# Altium PCB BetaBake_REV_1.0.PcbDoc (part 6 of 8)
Units mil, origin at the board's own origin, x right, y up, seen from the top; angles counter-clockwise.
Board outline 6000 x 4000 mil, 8 copper layers (USB 2.0 (90 Diff) DDR3 Data (50-100), GND (Top Layer high-speed return paths), DDR3 Fly-by Routing (Address, Command, Control), QSPI Flash (Clk, IO), Int4 PWR, Int5 GND (Shielding between L4 and L6), Int6 eMMC High-Speed Data Lines (8-bit bus), SDIO/peripherals, Int7 GND, Escapes, non-critical tracks, decoupling capacitor vias), stack 60.424 mil thick; 426 components, 331 nets, 1941 pads, 428 vias.
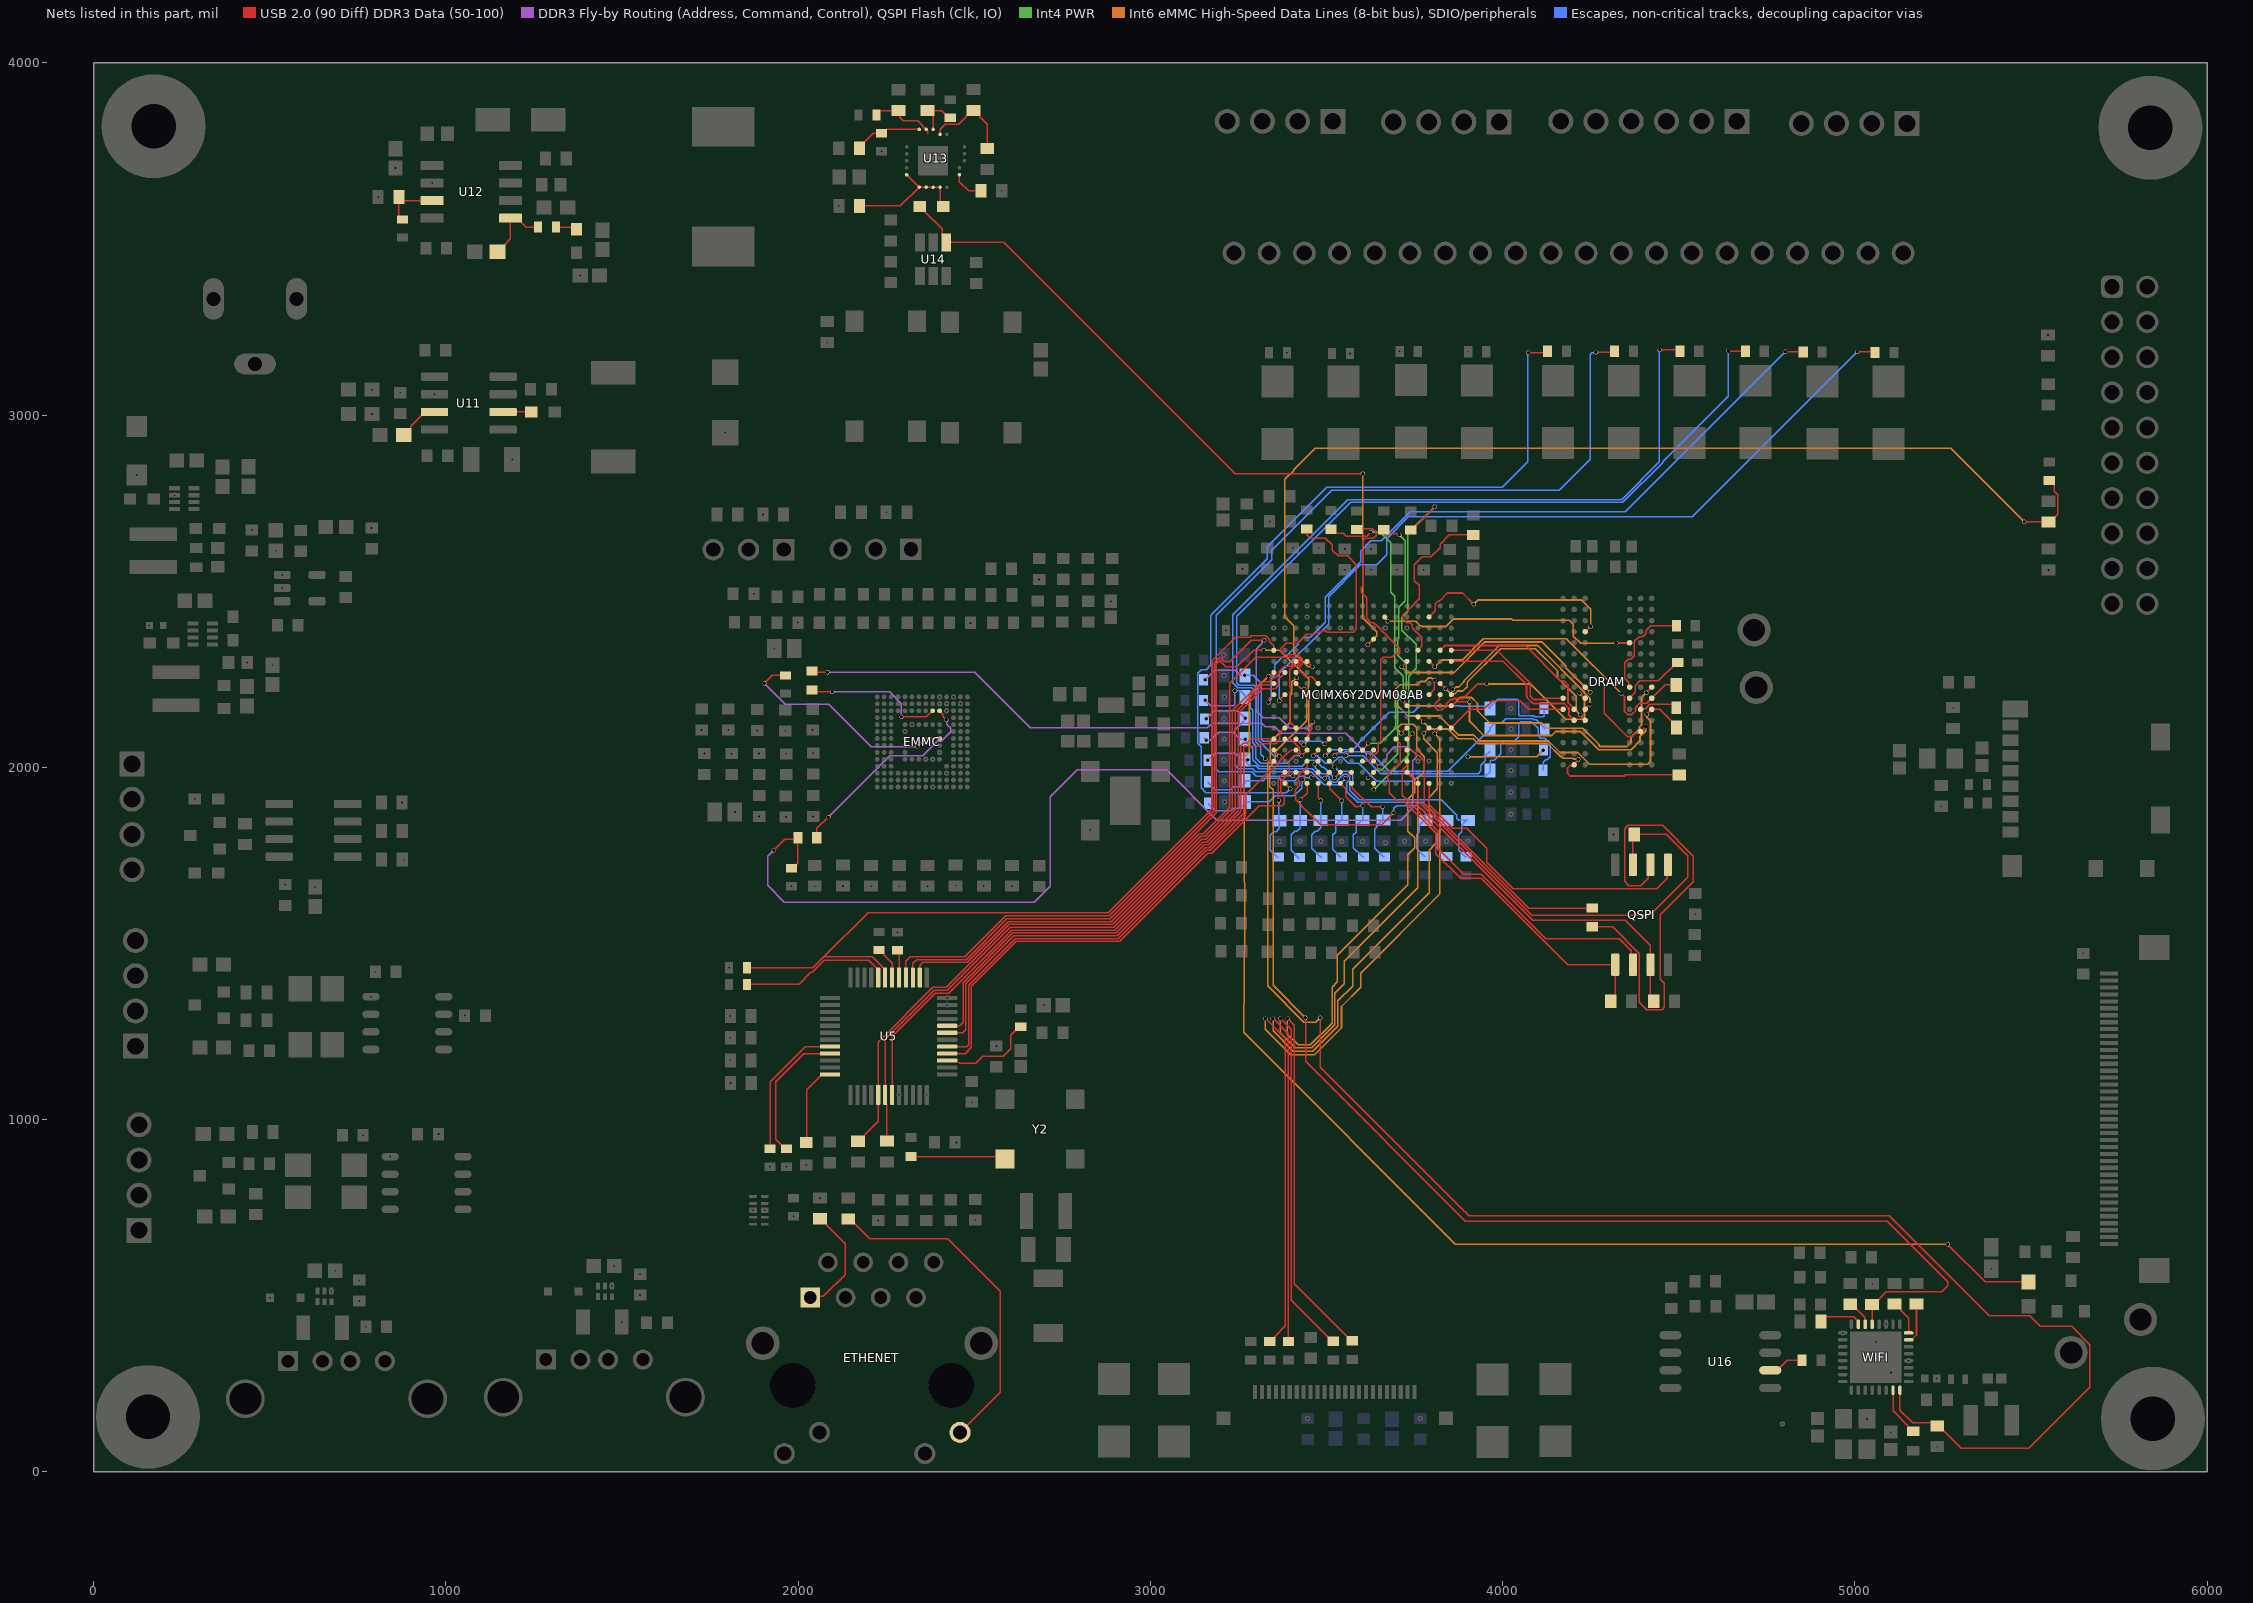
[diagram p11: the nets of this part, all layers, seen from the top]

## Via types
v1: diameter 12, hole 10, USB 2.0 (90 Diff) DDR3 Data (50-100) to Escapes, non-critical tracks, decoupling capacitor vias, 382 vias
v2: diameter 50, hole 26, USB 2.0 (90 Diff) DDR3 Data (50-100) to Escapes, non-critical tracks, decoupling capacitor vias, 28 vias
v3: diameter 19.68, hole 7.87, USB 2.0 (90 Diff) DDR3 Data (50-100) to Escapes, non-critical tracks, decoupling capacitor vias, 9 vias
v4: diameter 23.62, hole 11.81, USB 2.0 (90 Diff) DDR3 Data (50-100) to Escapes, non-critical tracks, decoupling capacitor vias, 5 vias
v5: diameter 7.87, hole 7.87, USB 2.0 (90 Diff) DDR3 Data (50-100) to Escapes, non-critical tracks, decoupling capacitor vias, 4 vias

## Nets (pads, with @x,y where several pads share a name; then routed paths per layer and width w, separated by ;. In a path a pad name is that pad's centre, name@x,y a point inside that pad or via, vN(x,y) a via of type N, cw(c..) or ccw(c..) an arc to the next point about the centre after c; other vN are vias at no path point) (continued)
NetR10_2: MCIMX6Y2DVM08AB.D10 R10.2 R117.1 | length 770
  USB 2.0 (90 Diff) DDR3 Data (50-100) w4: v1(3555,2033) 3555,2033.13 3570.75,2048.88 MCIMX6Y2DVM08AB.D10@3570.75,2049.01
  Int6 eMMC High-Speed Data Lines (8-bit bus), SDIO/peripherals w4: v1(3901,2030) 4096.64,2030 v1(4115.64,2049)
  Escapes, non-critical tracks, decoupling capacitor vias w4: v1(3555,2033) 3603.86,2033 3654.59,1982.27 3930.27,1982.27 3938,1990 3938,2005.62 3950.72,2018.34 R10.2@3950.72,2032.31 ; v1(3901,2030) 3944.47,2030 3946.79,2032.31 R10.2@3950.72,2032.31 ; R10.2@3964.47,2046.06 R10.2@3950.72,2032.31
NetR11_2: MCIMX6Y2DVM08AB.B10 R11.2 R110.1 | length 646.7
  USB 2.0 (90 Diff) DDR3 Data (50-100) w4: v1(3554,1969) 3554,1969.13 3570.75,1985.88 MCIMX6Y2DVM08AB.B10@3570.75,1986.02
  DDR3 Fly-by Routing (Address, Command, Control), QSPI Flash (Clk, IO) w4: v1(3158.45,2138.34) 3180.74,2160.63 3247.12,2160.63 v1(3268.76,2138.98)
  Escapes, non-critical tracks, decoupling capacitor vias w4: R110.1@3153.28,2137 3155.46,2137 ccw(c3155.46,2141) v1(3158.45,2138.34) ; v1(3268.76,2138.98) 3268.76,2135.05 3241,2107.28 3241,2005.83 3251.16,1995.67 3290.31,1995.67 3298.32,1987.66 3456.44,1987.66 3494.1,1950 3535,1950 v1(3554,1969)
NetR12_2: MCIMX6Y2DVM08AB.A10 R12.2 R111.1 | length 292.4
  USB 2.0 (90 Diff) DDR3 Data (50-100) w4: MCIMX6Y2DVM08AB.A10@3570.75,1954.52 3571.45,1954.52 3572.76,1953.21 3572.76,1941.24 3626.51,1887.49 v1(3659,1887.49)
  Escapes, non-critical tracks, decoupling capacitor vias w4: v1(3659,1887.49) 3659,1853.28 R12.2@3662.24,1850.04 3658.3,1850.04 3644.55,1836.29 3644.55,1832.35 3636.55,1824.35 3636.55,1770.29 3661.22,1745.63 R111.1@3664.24,1745.63
NetR13_2: MCIMX6Y2DVM08AB.D11 R13.2 R119.1 | length 728
  USB 2.0 (90 Diff) DDR3 Data (50-100) w4: v1(3523,2033) 3523.12,2033 3539.13,2049.01 MCIMX6Y2DVM08AB.D11@3539.25,2049.01
  Escapes, non-critical tracks, decoupling capacitor vias w4: v1(3523,2033) 3531.93,2041.93 3549.79,2041.93 3551.86,2044 3622.14,2044 3677.87,1988.27 3843.74,1988.27 3946.79,2091.31 3950.72,2091.31 3964.47,2105.06 R13.2@3964.47,2109 3964.47,2112.94 3978.22,2126.69 3997.29,2126.69 4008.6,2137.99 4085.12,2137.99 4088.43,2134.69 4095.98,2134.69 4119.64,2111.02 R119.1@4119.64,2108
NetR14_2: MCIMX6Y2DVM08AB.B11 R14.2 R120.1 | length 497
  USB 2.0 (90 Diff) DDR3 Data (50-100) w4: v1(3522,1970) 3522.62,1970 3538.63,1986.02 MCIMX6Y2DVM08AB.B11@3539.25,1986.02
  DDR3 Fly-by Routing (Address, Command, Control), QSPI Flash (Clk, IO) w4: v1(3157.85,2076.45) 3169.9,2076.45 3193.46,2100 3235.82,2100 3256.76,2079.06 3267.84,2079.06 v1(3268.76,2079.98)
  Escapes, non-critical tracks, decoupling capacitor vias w4: R120.1@3153,2084 3157.85,2079.15 v1(3157.85,2076.45) ; v1(3268.76,2079.98) 3268.76,2076.05 3290.51,2054.3 3290.51,2021.46 3308.31,2003.66 3430.91,2003.66 3447.21,2019.95 3469.09,2019.95 3488.54,2000.5 3491.5,2000.5 v1(3522,1970)
NetR15_2: MCIMX6Y2DVM08AB.A11 R15.2 R122.1 | length 278.2
  USB 2.0 (90 Diff) DDR3 Data (50-100) w4: MCIMX6Y2DVM08AB.A11@3539.25,1954.52 3555,1938.77 3555,1916 3583.51,1887.49 3588.08,1887.49 3590.55,1889.95 3600.71,1889.95 v1(3602.24,1891.49)
  Escapes, non-critical tracks, decoupling capacitor vias w4: v1(3602.24,1891.49) R15.2@3602.24,1849.04 3598.3,1849.04 3584.55,1835.29 3584.55,1816.22 3576.55,1808.22 3576.55,1771.29 3602.22,1745.63 R122.1@3605.24,1745.63
NetR16_2: MCIMX6Y2DVM08AB.E12 R16.2 R125.1 | length 553.1
  USB 2.0 (90 Diff) DDR3 Data (50-100) w4: v1(3494.32,2066.7) 3494.32,2066.89 3507.76,2080.32 MCIMX6Y2DVM08AB.E12@3507.76,2080.5
  DDR3 Fly-by Routing (Address, Command, Control), QSPI Flash (Clk, IO) w4: v1(3155.85,2249) 3182.69,2275.84 3241.35,2275.84 3256.19,2261 v1(3268,2261)
  Escapes, non-critical tracks, decoupling capacitor vias w4: R125.1@3151,2249 v1(3155.85,2249) ; v1(3268,2261) 3292,2261 3314.51,2238.49 3314.51,2080.28 3320.79,2074 3484.86,2074 3492.16,2066.7 v1(3494.32,2066.7)
NetR17_2: MCIMX6Y2DVM08AB.D12 R17.2 R112.1 | length 785
  USB 2.0 (90 Diff) DDR3 Data (50-100) w4: v1(3496.27,2033.26) 3496.27,2035.39 3507.76,2046.88 MCIMX6Y2DVM08AB.D12@3507.76,2049.01
  Escapes, non-critical tracks, decoupling capacitor vias w4: v1(3496.27,2033.26) 3513.01,2050 3575,2050 3591.74,2066.74 3591.74,2070 3678.24,2156.5 3745.5,2156.5 3764.17,2175.17 3878.14,2175.17 3879.31,2174 3957,2174 R17.2@3964,2167 3964,2170.94 3985.75,2192.69 4041.29,2192.69 4045.39,2188.58 4045.39,2149.53 4048.93,2145.99 4088.44,2145.99 4090.75,2143.67 4115.3,2143.67 4117.64,2146.01 R112.1@4117.64,2168
NetR18_2: MCIMX6Y2DVM08AB.C12 R18.2 R127.1 | length 627.2
  USB 2.0 (90 Diff) DDR3 Data (50-100) w4: MCIMX6Y2DVM08AB.C12@3507.76,2017.51 v1(3523,2001)
  Escapes, non-critical tracks, decoupling capacitor vias w4: v1(3523,2001) 3535,1989 3562.28,1989 3574,1977.28 3574,1960.72 3566.1,1952.82 3566.1,1934.7 3592.8,1908 3825.67,1908 3868.98,1864.69 3868.98,1856.08 3875.55,1849.51 R18.2@3897.3,1849.51 ; R127.1@3896.24,1746.27 3893.22,1746.27 3875.55,1763.93 3875.55,1808.69 3883.55,1816.69 3883.55,1835.76 R18.2@3897.3,1849.51 ; R18.2@3901.24,1849.51 R18.2@3897.3,1849.51
NetR19_2: MCIMX6Y2DVM08AB.B12 R19.2 R128.1 | length 417.5
  USB 2.0 (90 Diff) DDR3 Data (50-100) w4: v1(3494.86,1968.86) 3494.86,1969.08 3492.97,1970.97 MCIMX6Y2DVM08AB.B12@3507.76,1986.02
  DDR3 Fly-by Routing (Address, Command, Control), QSPI Flash (Clk, IO) w4: v1(3163.24,2019.98) 3183.87,2040.61 3241,2040.61 3259.63,2021.98 v1(3277,2021.98)
  Escapes, non-critical tracks, decoupling capacitor vias w4: v1(3163.24,2019.98) R128.1@3168.09,2019.98 ; v1(3277,2021.98) R19.2@3268.76,2021.98 3268.76,2018.05 3282.51,2004.3 3299.19,2004.3 3307.83,1995.66 3459.75,1995.66 3485.02,1970.39 3493.33,1970.39 v1(3494.86,1968.86)
NetR20_2: MCIMX6Y2DVM08AB.A12 R20.2 R113.1 | length 251.9
  USB 2.0 (90 Diff) DDR3 Data (50-100) w4: MCIMX6Y2DVM08AB.A12@3507.76,1954.52 3507.76,1953.88 3508.93,1952.71 3508.93,1939.07 v1(3543,1905)
  Escapes, non-critical tracks, decoupling capacitor vias w4: R113.1@3542.24,1745.63 3539.22,1745.63 3517.55,1767.29 3517.55,1808.22 3525.55,1816.22 3525.55,1835.29 3539.3,1849.04 R20.2@3543.24,1849.04 3543.24,1905.01 ccw(c3539.24,1904.98) 3543.08,1906.1 v1@3543.24,1908.4
NetR21_2: MCIMX6Y2DVM08AB.D13 R21.2 R129.1 | length 989.7
  USB 2.0 (90 Diff) DDR3 Data (50-100) w4: v1(3462.34,2033) 3462.34,2034.05 3476.26,2047.96 MCIMX6Y2DVM08AB.D13@3476.26,2049.01
  Escapes, non-critical tracks, decoupling capacitor vias w4: v1(3462.34,2033) 3462.79,2032.56 3474.34,2032.56 3495.9,2011 3516.48,2011 3534.49,2029.01 3544.85,2029.01 3561.93,2011.93 3590.93,2011.93 3642.86,1960 3745.45,1960 3759.69,1974.23 3950.72,1974.23 3964.47,1987.98 R21.2@3964.47,1991 3964.47,2019.71 3964.76,2020 3975.56,2020 3994,2038.44 3994,2064.39 4005.29,2075.69 4034.13,2075.69 4045.28,2086.83 4045.28,2124.36 4050.91,2129.99 4081.81,2129.99 4100.51,2111.28 4100.51,2089.69 4107.87,2082.34 4119.74,2082.34 4134.61,2067.47 4134.61,2030.53 4126.34,2022.26 4122.91,2022.26 4114.64,2013.99 R129.1@4114.64,1992
NetR22_2: MCIMX6Y2DVM08AB.C13 R22.2 R102.1 | length 650.4
  USB 2.0 (90 Diff) DDR3 Data (50-100) w4: v1(3466.26,2008.64) 3466.26,2009.97 3464.77,2011.46 MCIMX6Y2DVM08AB.C13@3476.26,2017.51
  Escapes, non-critical tracks, decoupling capacitor vias w4: v1(3466.26,2008.64) 3467.79,2007.11 3467.79,1998.93 3485.3,1981.42 3499.26,1981.42 3508.15,1972.54 3508.15,1966.88 3517.03,1958 3526.97,1958 3538,1969.03 3538,1969.97 3549.03,1981 3558.97,1981 3566,1973.97 3566,1964.03 3558.1,1956.13 3558.1,1931.39 3588,1901.49 3773.18,1901.49 3806.92,1867.75 3806.92,1857.14 3814.55,1849.51 R22.2@3836.3,1849.51 ; R22.2@3840.24,1849.51 R22.2@3836.3,1849.51 ; R102.1@3841.24,1747.27 3838.22,1747.27 3814.55,1770.93 3814.55,1808.69 3822.55,1816.69 3822.55,1835.76 R22.2@3836.3,1849.51
NetR23_2: MCIMX6Y2DVM08AB.B13 R23.2 R103.1 | length 354.2
  USB 2.0 (90 Diff) DDR3 Data (50-100) w4: v1(3456.04,1971.09) 3457.57,1972.62 3462.86,1972.62 MCIMX6Y2DVM08AB.B13@3476.26,1986.02
  Escapes, non-critical tracks, decoupling capacitor vias w4: R103.1@3164.52,1958.98 3164.52,1955.96 3184.19,1936.3 3227.94,1936.3 3235.94,1944.3 3255.02,1944.3 3268.76,1958.05 R23.2@3268.76,1961.98 3320.19,1961.98 3326.65,1968.45 3366.05,1968.45 3372.9,1961.6 3410.43,1961.6 3423.25,1974.43 3437.2,1974.43 3440.54,1971.09 v1(3456.04,1971.09)
NetR24_2: MCIMX6Y2DVM08AB.A13 R24.2 R105.1 | length 241.1
  USB 2.0 (90 Diff) DDR3 Data (50-100) w4: MCIMX6Y2DVM08AB.A13@3476.26,1954.52 3476.26,1914.23 3484,1906.49 v1(3484,1905)
  Escapes, non-critical tracks, decoupling capacitor vias w4: 3483.24,1893.07 cw(c3479.24,1893) 3483.24,1893 ; v1@3483.24,1905 3483.24,1893 ; R105.1@3486.24,1744.63 3483.22,1744.63 3457.55,1770.29 3457.55,1808.69 3467.32,1818.46 3473.46,1818.46 3483.24,1828.24 R24.2@3483.24,1849.51 3483.24,1893
NetR25_2: MCIMX6Y2DVM08AB.D14 R25.2 R106.1 | length 528.1
  USB 2.0 (90 Diff) DDR3 Data (50-100) w4: v1(3429,2033) 3429,2033.12 3444.76,2048.89 MCIMX6Y2DVM08AB.D14@3444.76,2049.01
  DDR3 Fly-by Routing (Address, Command, Control), QSPI Flash (Clk, IO) w4: v1(3155.85,2190) 3170.85,2175 3235.88,2175 3239.3,2178.42 v1(3239.3,2217.49)
  Escapes, non-critical tracks, decoupling capacitor vias w4: R106.1@3151,2190 v1(3155.85,2190) ; v1(3239.3,2217.49) 3255.31,2217.49 3269.06,2203.75 R25.2@3269.06,2200 3282.8,2186.25 3282.8,2169.52 3290.51,2161.81 3290.51,2069.35 3298.51,2061.35 3298.51,2026.14 3313,2011.66 3388.49,2011.66 3409.83,2033 v1(3429,2033)
NetR26_2: MCIMX6Y2DVM08AB.C14 R26.2 R107.1 | length 707.2
  USB 2.0 (90 Diff) DDR3 Data (50-100) w4: MCIMX6Y2DVM08AB.C14@3444.76,2017.51 3444.76,2005.25 3444.55,2005.03 3444.55,2001.76 3425.88,1983.09 3425.88,1982.67 3420.01,1976.8 3420.01,1963.74 3424.55,1959.19 3424.55,1949.14 3411.73,1936.31 3411.73,1920.41 3411.92,1920.22 3411.92,1907.94 3443.87,1875.99 3444.95,1875.99 3483.24,1837.7 3656.82,1837.7 v1(3690.32,1871.21)
  Escapes, non-critical tracks, decoupling capacitor vias w4: v1(3690.32,1871.21) 3690.93,1871.81 3690.93,1883.21 3699.25,1891.53 3706.31,1891.53 3706.35,1891.57 3759.52,1891.57 3779.82,1871.26 3779.82,1852.03 3763.55,1835.76 3763.55,1816.69 3755.55,1808.69 3755.55,1769.29 3777.22,1747.63 R107.1@3780.24,1747.63
NetR27_2: MCIMX6Y2DVM08AB.B14 R27.2 R108.1 | length 355.2
  USB 2.0 (90 Diff) DDR3 Data (50-100) w4: v1(3433.09,1964.39) 3434.63,1965.92 3434.63,1975.88 MCIMX6Y2DVM08AB.B14@3444.76,1986.02
  Escapes, non-critical tracks, decoupling capacitor vias w4: R108.1@3165.24,1897.98 3165.24,1894.96 3183.9,1876.3 3228.41,1876.3 3236.41,1884.3 3255.49,1884.3 3269.24,1898.05 R27.2@3269.24,1901.98 3336.98,1901.98 3354,1919 3407,1919 3429.02,1941.02 3429.02,1950.39 3431.56,1952.94 3431.56,1962.86 v1(3433.09,1964.39)
NetR28_2: MCIMX6Y2DVM08AB.A14 R28.2 R109.1 | length 245.1
  USB 2.0 (90 Diff) DDR3 Data (50-100) w4: v1(3426.06,1907.94) 3426.06,1908.06 3444.76,1926.76 MCIMX6Y2DVM08AB.A14@3444.76,1954.52
  Escapes, non-critical tracks, decoupling capacitor vias w4: R109.1@3423.24,1743.63 3420.22,1743.63 3399.55,1764.29 3399.55,1808.69 3409.09,1818.23 3415.7,1818.23 3425.24,1827.76 R28.2@3425.24,1849.51 3426.06,1850.34 v1(3426.06,1907.94)
NetR29_2: MCIMX6Y2DVM08AB.B16 R29.2 R130.1 | length 275.2
  USB 2.0 (90 Diff) DDR3 Data (50-100) w4: v1(3365,1906) 3363.56,1907.44 3363.56,1967.8 MCIMX6Y2DVM08AB.B16@3381.77,1986.02
  Escapes, non-critical tracks, decoupling capacitor vias w4: R130.1@3363.24,1744.98 3360.22,1744.98 3340.55,1764.65 3340.55,1807.69 3350.09,1817.23 3356.7,1817.23 3366.24,1826.76 R29.2@3366.24,1848.51 3366.17,1848.58 cw(c3369,1851.4) 3365,1851.4 v1(3365,1906)
NetR40_1: MCIMX6Y2DVM08AB.N4 R40.1 | length 508.2
  USB 2.0 (90 Diff) DDR3 Data (50-100) w4: MCIMX6Y2DVM08AB.N4@3759.91,2332.47 MCIMX6Y2DVM08AB.N4@3759.72,2332.47 3771.01,2343.76 3771.01,2368.64 3755.47,2384.18 3755.05,2384.18 3743.06,2396.17 3743.06,2404.48 3736.61,2410.93 3728.3,2410.93 3716.94,2422.29 3716.94,2431.63 3728.02,2442.71 3728.44,2442.71 3748.44,2462.71 3748.44,2464.3 3763,2478.86 3763,2516.45 3749.24,2530.21 3749.24,2574.94 3771.59,2597.29 3796.44,2597.29 3822.28,2623.14 3822.28,2634.04 3848.13,2659.88 R40.1@3916,2659.88
NetR41_2: DRAM.K7 R41.2 | length 190.5
  USB 2.0 (90 Diff) DDR3 Data (50-100) w4: DRAM.K7@4360.37,2196.24 4360.37,2197.24 4376.25,2213.12 4376.25,2231.73 4389.89,2245.36 4442.09,2245.36 4494.34,2297.62 R41.2@4497.36,2297.62
NetR42_2: DRAM.J7 R42.2 | length 293.8
  USB 2.0 (90 Diff) DDR3 Data (50-100) w4: DRAM.J7@4360.37,2227.73 4358.4,2229.71 4358.4,2241.6 4346.51,2253.49 4346.51,2296.47 4356.51,2306.47 4364.23,2306.47 4374.23,2316.48 4374.23,2357.73 4387.85,2371.35 4397.61,2371.35 4407.32,2381.06 4407.32,2388.78 4420.8,2402.26 R42.2@4493.36,2402.26
NetR43_1: DRAM.L8 R43.1 | length 110.6
  USB 2.0 (90 Diff) DDR3 Data (50-100) w4: DRAM.L8@4391.87,2164.74 4393.84,2166.72 4405.73,2166.72 4417.62,2178.6 4483.46,2178.6 R43.1@4492.8,2169.26
NetR44_1: DRAM.K9 MCIMX6Y2DVM08AB.M3 R44.1 | length 902.3
  USB 2.0 (90 Diff) DDR3 Data (50-100) w5.12: MCIMX6Y2DVM08AB.M3@3791.22,2300.98 3791.22,2300.88 3807,2285.1 v1(3807,2285) ; v1(4336,2210) 4345.86,2200.14 4345.86,2158.86 4354.4,2150.32 4366.34,2150.32 4377.44,2161.42 4377.44,2170.71 4388.54,2181.81 4408.72,2181.81 4423.15,2196.24 DRAM.K9@4423.36,2196.24 4461.39,2234.26 R44.1@4492.83,2234.26
  Int6 eMMC High-Speed Data Lines (8-bit bus), SDIO/peripherals w5.12: v1(3807,2285) 3826.44,2304.44 3856.44,2304.44 ; 3851.2,2299.2 3856.44,2304.44 ; v1(4336,2210) 4180.88,2365.12 3945.46,2365.12 3884.78,2304.44 3856.44,2304.44
NetR45_2: DRAM.T2 MCIMX6Y2DVM08AB.G4 R45.2 | length 885.7
  USB 2.0 (90 Diff) DDR3 Data (50-100) w5.12: MCIMX6Y2DVM08AB.G4@3759.72,2143.5 3759.72,2143.39 3774,2129.11 v1(3774,2129) ; v1(4214.96,2022.96) 4214.96,2021.14 4202.89,2009.07 DRAM.T2@4202.89,2007.26 4200.86,2005.23 4191.23,2005.23 4184,1998 4184,1983 4191.71,1975.29 4344.99,1975.29 4348.43,1978.73 R45.2@4501.36,1978.73
  Int6 eMMC High-Speed Data Lines (8-bit bus), SDIO/peripherals w5.12: v1(3774,2129) 3794.44,2108.56 3844.76,2108.56 3872.07,2081.25 3916.46,2081.25 3930,2067.72 4127.22,2067.72 4164.97,2029.96 4167.8,2029.96 4171.76,2026 4198.72,2026 4201.28,2023.44 4214.47,2023.44 v1(4214.96,2022.96)
NetR46_2: DRAM.L9 MCIMX6Y2DVM08AB.J3 R46.2 | length 1266
  USB 2.0 (90 Diff) DDR3 Data (50-100) w5.12: MCIMX6Y2DVM08AB.J3@3791.22,2206.49 3806,2221.27 3806,2246.92 v1(3806.52,2247.44) ; v1(4408.94,2150.32) DRAM.L9@4423.36,2164.74 4446.29,2164.74 4493.83,2117.2 R46.2@4493.83,2113.26
  Int6 eMMC High-Speed Data Lines (8-bit bus), SDIO/peripherals w5.12: v1(3806.52,2247.44) 3804.66,2247.44 3798.1,2254 3790.08,2254 3780.2,2244.12 3767.46,2244.12 3757.9,2234.56 3708.56,2234.56 3695,2221 3695,2182.02 3731.23,2145.79 3820.42,2145.79 3873.96,2092.25 3917.2,2092.25 3934.62,2074.83 4130.16,2074.83 4162.91,2042.09 4213.58,2042.09 4246.67,2009 4411.76,2009 4419.56,2016.8 4419.56,2132.01 4408.94,2142.63 v1(4408.94,2150.32)
NetR54_1: MCIMX6Y2DVM08AB.C8 R54.1 R64.1 | length 2839
  USB 2.0 (90 Diff) DDR3 Data (50-100) w4: v1(1930,1764) 1961.28,1795.28 1994.63,1795.28 R64.1@1999.36,1800 1999.36,1728.01 1984.94,1713.59 R54.1@1981,1713.59 ; MCIMX6Y2DVM08AB.C8@3633.74,2017.51 3633.74,2017.39 3649,2002.13 v1(3649,2002)
  DDR3 Fly-by Routing (Address, Command, Control), QSPI Flash (Clk, IO) w4: v1(1930,1764) 1913,1747 1913,1665 1961,1617 2670,1617 2715,1662 2715,1916 2791.92,1992.92 3045.76,1992.92 3188.68,1850 3710,1850 3744.94,1884.94 3744.94,2019 3754.53,2028.58 3754.53,2036.87 3743.96,2047.43 3741.57,2047.43 3731,2058 3692.86,2058 3671,2036.14 3671,2024 v1(3649,2002)
NetR63_1: MCIMX6Y2DVM08AB.D8 R63.1 | length 1712
  USB 2.0 (90 Diff) DDR3 Data (50-100) w4: R63.1@2039,2273.28 2042.28,2270 v1(2083,2270) ; v1(3618.25,2033.5) 3618.25,2033.75 3618,2034 MCIMX6Y2DVM08AB.D8@3633.74,2049.01
  DDR3 Fly-by Routing (Address, Command, Control), QSPI Flash (Clk, IO) w4: v1(2083,2270) 2501,2270 2659,2112 3031.69,2112 3162,2112 3175,2125 3316.77,2125 3326.65,2115.12 3353.12,2115.12 3371.5,2096.74 3528.28,2096.74 3528.6,2097.06 3554.79,2097.06 3618.25,2033.6 v1(3618.25,2033.5)
NetR63_2: EMMC.M6 R63.2 | length 404.4
  USB 2.0 (90 Diff) DDR3 Data (50-100) w4: R63.2@2039,2220 2045,2214 v1(2097,2214) ; v1(2293,2143) 2364.21,2143 EMMC.M6@2381.92,2160.7
  DDR3 Fly-by Routing (Address, Command, Control), QSPI Flash (Clk, IO) w4: v1(2097,2214) 2260,2214 2293,2181 v1(2293,2143)
NetR64_2: EMMC.M5 R64.2 | length 593.3
  USB 2.0 (90 Diff) DDR3 Data (50-100) w4: R64.2@2052.64,1800 2052.64,1826.64 2085,1859 v1(2086,1859) ; EMMC.M5@2401.6,2160.7 2410.93,2151.38 2410.93,2144.81 v1(2421,2134.74)
  DDR3 Fly-by Routing (Address, Command, Control), QSPI Flash (Clk, IO) w4: v1(2086,1859) 2260.5,2033.5 2353.42,2033.5 2394.46,2074.54 2406.51,2074.54 2433,2101.03 2433,2110.97 2421.23,2122.74 2421.23,2134.51 v1(2421,2134.74)
NetR65_2: EMMC.H5 R65.2 | length 657.1
  USB 2.0 (90 Diff) DDR3 Data (50-100) w4: v1(1904,2239) 1926,2261 R65.2@1964,2261 R65.2@1962.93,2262.07 ; R65.2@1958.5,2262.9 cw(c1960.1,2259.24) R65.2@1962.91,2262.09 ; v1(2338,2059) 2360.96,2081.96 EMMC.H5@2401.6,2081.96
  DDR3 Fly-by Routing (Address, Command, Control), QSPI Flash (Clk, IO) w4: v1(1904,2239) 1963.73,2179.27 2086.64,2179.27 2206.91,2059 v1(2338,2059)
NetR66_2: MCIMX6Y2DVM08AB.E6 QSPI.1 R66.2 | length 1165.9
  USB 2.0 (90 Diff) DDR3 Data (50-100) w4: MCIMX6Y2DVM08AB.E6@3696.73,2080.5 3709.94,2067.29 3709.94,2011.94 3699.77,2001.76 3693.69,2001.76 3678.52,1986.59 3678.52,1980.51 3673.24,1975.24 3673.24,1965.3 3678.52,1960.02 3678.52,1927.45 3702.97,1903 3721.04,1903 3810.37,1813.66 3810.37,1755.02 3880.36,1685.04 3939,1685.04 4184.38,1439.66 QSPI.1@4319.68,1439.66 4319.68,1348.68 R66.2@4307,1336
NetR67_2: MCIMX6Y2DVM08AB.A4 QSPI.7 R67.2 | length 1319.9
  USB 2.0 (90 Diff) DDR3 Data (50-100) w4: MCIMX6Y2DVM08AB.A4@3759.72,1954.52 3759.72,1903.28 4083,1580 4417,1580 4525,1688 4525,1749 4464.64,1809.36 R67.2@4373.74,1809.36 4369.68,1805.31 QSPI.7@4369.68,1723.52
NetR68_2: MCIMX6Y2DVM08AB.B5 QSPI.3 R68.2 | length 1094.5
  USB 2.0 (90 Diff) DDR3 Data (50-100) w4: MCIMX6Y2DVM08AB.B5@3728.23,1986.02 3746.44,1967.8 3746.44,1905.25 4085.36,1566.32 4348.68,1566.32 4419.68,1495.32 QSPI.3@4419.68,1439.66 4419.68,1345.32 R68.2@4429,1336
NetR69_1: MCIMX6Y2DVM08AB.D5 R69.1 | length 782.8
  USB 2.0 (90 Diff) DDR3 Data (50-100) w4: MCIMX6Y2DVM08AB.D5@3728.23,2049.01 3728.8,2048.43 3742.96,2048.43 3758.86,2032.54 3763.49,2032.54 3778.01,2018.01 3778.01,1896.31 3783.22,1891.09 4073.67,1600.64 R69.1@4254,1600.64
NetR69_2: QSPI.6 R69.2 | length 1365.1
  USB 2.0 (90 Diff) DDR3 Data (50-100) w4: R69.2@4254,1547.36 4311.91,1547.36 4387.8,1471.46 4387.8,1333.28 4408.77,1312.31 4452.56,1312.31 4458.53,1318.28 4458.53,1387.47 4447,1399 4447,1581.18 4540.82,1675 4540.82,1748.18 4453.95,1835.05 4355.51,1835.05 4346,1825.54 4346,1676 4358,1664 4392,1664 4413.12,1685.12 4413.12,1716.96 QSPI.6@4419.68,1723.52
NetR70_2: R70.2 Y2.3 | length 267.6
  USB 2.0 (90 Diff) DDR3 Data (50-100) w4: R70.2@2320,895.36 2321.36,894 Y2.3@2587,894
NetR72_1: ETHENET.1 R72.1 | length 315.5
  USB 2.0 (90 Diff) DDR3 Data (50-100) w4: ETHENET.1@2034.5,494.74 2038.76,499 2070.34,499 ccw(c2070.34,503) 2073.16,500.16 2133,560 2133,647.47 2079.69,700.79 2079.69,704.72 2065.94,718.47 R72.1@2062,718.47
NetR74_1: ETHENET.12 R74.1 | length 964.6
  USB 2.0 (90 Diff) DDR3 Data (50-100) w4: R74.1@2142,718 2145.94,718 2202.94,661 2425,661 2573.5,512.5 2573.5,225.74 ETHENET.12@2459.5,111.74
NetR75_1: MCIMX6Y2DVM08AB.N17 R75.1 U5.7 | length 2371.4
  USB 2.0 (90 Diff) DDR3 Data (50-100) w4: R75.1@1854.59,1431 2042,1431 2073,1462 ; U5.7@2246.89,1403 2246.89,1425.64 2210.53,1462 2073,1462 ; 3129.18,1836 2880.59,1587.41 2198.41,1587.41 2073,1462 ; 3221.19,2348.68 3241.75,2369.25 3282.99,2369.25 3286.74,2373 3327.97,2373 3336.99,2363.98 3336.99,2358.47 3349.7,2345.76 3349.7,2333.05 MCIMX6Y2DVM08AB.N17@3350.28,2332.47
  USB 2.0 (90 Diff) DDR3 Data (50-100) w5: 3129.18,1836 3174.57,1881.39 3174.57,2302.07 3221.19,2348.68
NetR76_1: R76.1 U5.8 | length 434.3
  USB 2.0 (90 Diff) DDR3 Data (50-100) w4: R76.1@1854.59,1384 2002.35,1384 2036.35,1418 2040.31,1418 2074.31,1452 2200.84,1452 2227.2,1425.64 U5.8@2227.2,1403
NetR77_1: MCIMX6Y2DVM08AB.M15 R77.1 U5.29 | length 2107.2
  USB 2.0 (90 Diff) DDR3 Data (50-100) w4: R77.1@2170,938.53 2173.94,938.53 2187.69,952.28 2187.69,956.21 2227.2,995.73 U5.29@2227.2,1070.32 2227.2,1219.83 2382.37,1375 2420.43,1375 2599.43,1554 2892.43,1554 3142.43,1804 3153.63,1804 3233,1883.37 3233,2160.63 3315.86,2243.49 3336.99,2243.49 3348.29,2254.78 3354.36,2254.78 3365.66,2266.08 3365.66,2272.16 3380.47,2286.97 3397.83,2286.97 3403.62,2292.76 3405.05,2292.76 MCIMX6Y2DVM08AB.M15@3413.27,2300.98
NetR78_2: R78.2 U5.5 | length 123.8
  USB 2.0 (90 Diff) DDR3 Data (50-100) w4: R78.2@2268.25,1470.6 2278.06,1480.41 R78.2@2282,1480.41 2286.26,1476.15 U5.5@2286.26,1403 U5.5@2282.35,1429.54
NetR81_2: R81.2 U5.6 | length 123.1
  USB 2.0 (90 Diff) DDR3 Data (50-100) w4: R81.2@2229,1481.41 2232.94,1481.41 2242.75,1471.6 2242.75,1467.66 2266.57,1443.83 U5.6@2266.57,1403 U5.6@2262.67,1429.54
NetR82_1: MCIMX6Y2DVM08AB.K17 R82.1 U5.30 | length 1975.3
  USB 2.0 (90 Diff) DDR3 Data (50-100) w4: R82.1@2252,939.06 2252,1042.57 2246.89,1047.68 U5.30@2246.89,1070.32 2246.89,1228.2 2385.69,1367 2423.75,1367 2602.75,1546 2895.75,1546 3145.75,1796 3156.94,1796 3241,1880.06 3241,2156.7 3304.2,2219.9 3304.2,2220.51 3317.69,2234 3338.82,2234 3340.78,2235.96 3348.25,2235.96 MCIMX6Y2DVM08AB.K17@3350.28,2237.98
NetR85_2: R85.2 U5.39 | length 274.9
  USB 2.0 (90 Diff) DDR3 Data (50-100) w4: U5.39@2423.07,1167.76 2449.61,1163.86 2457.88,1160.85 ccw(c2459.25,1164.61) 2459.25,1160.61 2504.61,1160.61 2523.53,1179.53 2582.68,1179.53 2604,1200.84 2604,1239.35 2628.06,1263.41 R85.2@2632,1263.41
NetR86_1: R86.1 U5.24 | length 234.3
  USB 2.0 (90 Diff) DDR3 Data (50-100) w4: R86.1@2023,935.28 2024,936.28 2024,1084.64 2067.76,1128.39 U5.24@2090.39,1128.39
NetR87_1: R87.1 U5.20 | length 401.3
  USB 2.0 (90 Diff) DDR3 Data (50-100) w4: R87.1@1920,917.59 1920,1107 2020.13,1207.13 U5.20@2090.39,1207.13
NetR88_1: R88.1 U5.21 | length 419.1
  USB 2.0 (90 Diff) DDR3 Data (50-100) w4: R88.1@1967,917.59 1963.06,917.59 1936,944.65 1936,1107 2016.45,1187.45 U5.21@2090.39,1187.45 U5.21@2063.85,1183.54
NetR101_1: MCIMX6Y2DVM08AB.L17 R101.1 | length 3582.5
  USB 2.0 (90 Diff) DDR3 Data (50-100) w4: v1(3335,2259) 3336.53,2260.53 3341.33,2260.53 MCIMX6Y2DVM08AB.L17@3350.28,2269.48 ; v1(5264,646) 5264,644.42 5369.42,539 R101.1@5493,539
  Int6 eMMC High-Speed Data Lines (8-bit bus), SDIO/peripherals w4: v1(3335,2259) 3280.76,2204.76 3280.76,2042.72 3266.17,2028.13 ccw(c3269,2025.3) 3265,2025.3 3265,2021.98 ccw(c3277,2021.98) 3265,2021.9 3268.13,1558.08 cw(c3258.19,1558.02) 3268.13,1557.92 3265,1248.7 ccw(c3269,1248.66) 3266.16,1245.84 3866,646 v1(5264,646)
NetR121_1: MCIMX6Y2DVM08AB.A8 R121.1 | length 1024.1
  USB 2.0 (90 Diff) DDR3 Data (50-100) w4: v1(3634,1937) 3633.87,1937.13 3633.87,1954.39 MCIMX6Y2DVM08AB.A8@3633.74,1954.52 MCIMX6Y2DVM08AB.A8@3635.48,1954.52 ; R121.1@3739.36,2673.62 3742.38,2673.62 3807,2738.24 v1(3807,2740)
  Int4 PWR w4: v1(3634,1937) 3733,2036 3733,2258.86 3755,2280.86 3755,2310.33 3754.47,2310.87 3754.47,2349.24 3714.08,2389.63 3714.08,2424.08 3731.24,2441.24 3731.24,2664.24 v1(3807,2740)
NetR123_1: MCIMX6Y2DVM08AB.D9 R123.1 | length 866.6
  USB 2.0 (90 Diff) DDR3 Data (50-100) w4: R123.1@3513,2676 3523.97,2665.03 3547.4,2665.03 3556.4,2656.03 3614.03,2656.03 v1(3626,2668) ; MCIMX6Y2DVM08AB.D9@3602.24,2049.01 3602.24,2050.63 3618,2066.38 v1(3618,2068)
  Int4 PWR w4: v1(3618,2068) 3652.43,2068 3696.43,2112 3696.43,2193.38 3717.89,2214.84 3717.89,2259 3694,2282.88 3694,2486.14 3683,2497.14 3683,2637 3652,2668 v1(3626,2668)
NetR124_1: MCIMX6Y2DVM08AB.C9 R124.1 | length 866.3
  USB 2.0 (90 Diff) DDR3 Data (50-100) w4: R124.1@3586,2675 3589,2678 3630.14,2678 3640.71,2667.43 3640.71,2657.71 3633.03,2650.03 3609.37,2650.03 3603,2643.66 3603,2514.23 3599.09,2510.32 3599.09,2496.99 3614,2482.08 3614,2422.76 3625.87,2410.89 3634.27,2410.89 3646.14,2399.02 3646.14,2398.6 3662.79,2381.95 3663.21,2381.95 3680.98,2364.18 3680.98,2363.76 3692.06,2352.68 3692.48,2352.68 3708.02,2337.15 3708.02,2323.36 3705.66,2321 3694.45,2321 3685.71,2312.26 3660.56,2312.26 3653.95,2305.65 3653.95,2296.95 3653.58,2296.58 3653.58,2074.48 3646.59,2067.5 3646.59,2045.9 3632.62,2031.93 3632.21,2031.93 3617.78,2017.51 MCIMX6Y2DVM08AB.C9@3602.24,2017.51
NetR126_1: MCIMX6Y2DVM08AB.B8 R126.1 | length 850.4
  USB 2.0 (90 Diff) DDR3 Data (50-100) w4: v1(3618,1970) 3618,1970.14 3634,1986.14 3634,1990 3633.74,1989.74 MCIMX6Y2DVM08AB.B8@3633.74,1986.02 ; R126.1@3662.36,2674.62 3673.33,2663.65 3701.18,2663.65 3704.84,2660 v1(3707,2660)
  Int4 PWR w4: v1(3618,1970) 3640,1992 3655.14,1992 3702.43,2039.29 3702.43,2190.9 3727,2215.46 3727,2294.49 3702.8,2318.69 3702.8,2362.99 3704.8,2364.98 3704.8,2454.65 3723,2472.86 3723,2644 v1(3707,2660)
NetR134_1: MCIMX6Y2DVM08AB.M14 R134.1 R135.1 | length 3029.3
  USB 2.0 (90 Diff) DDR3 Data (50-100) w4: MCIMX6Y2DVM08AB.M14@3444.76,2300.98 3444.76,2300.61 3460,2285.37 v1(3460,2285) ; v1(5481,2697) 5549.47,2697 R135.1@5550,2696.47 5553.94,2696.47 5575.69,2718.22 5575.69,2773.76 5565.99,2783.46 5565.99,2803.03 5555.02,2814 R134.1@5552,2814
  Int6 eMMC High-Speed Data Lines (8-bit bus), SDIO/peripherals w4: v1(3460,2285) 3448,2285.03 3407,2326.03 3407,2401.73 3381.77,2426.96 3381.77,2817.43 3407,2842.66 3407,2845 3468,2906 4993.14,2906 5272,2906 v1(5481,2697)
NetR136_1: MCIMX6Y2DVM08AB.J16 R136.1 | length 2244.2
  USB 2.0 (90 Diff) DDR3 Data (50-100) w4: v1(3366,2189) 3366,2189.86 3381.77,2205.63 MCIMX6Y2DVM08AB.J16@3381.77,2206.49 ; v1(5006.45,3179.49) 5055.86,3179.49 R136.1@5057.36,3178
  Escapes, non-critical tracks, decoupling capacitor vias w4: v1(3366,2189) 3366,2266.9 3506,2406.9 3506,2484.42 3596.21,2574.63 3642.12,2574.63 3670.79,2603.3 3670.79,2649.21 3732.65,2711.06 4538.02,2711.06 v1(5006.45,3179.49)
NetR137_1: MCIMX6Y2DVM08AB.J17 R137.1 | length 2074.2
  USB 2.0 (90 Diff) DDR3 Data (50-100) w4: v1(3335.1,2184.41) 3336.63,2185.94 3336.63,2192.84 MCIMX6Y2DVM08AB.J17@3350.28,2206.49 ; v1(4803,3180) 4852.36,3180 R137.1@4853.36,3179
  Escapes, non-critical tracks, decoupling capacitor vias w4: v1(3335.1,2184.41) 3335.1,2184.68 3343.45,2193.03 3343.45,2253.31 3353.21,2263.07 3353.21,2290.82 3374.4,2312 3382.14,2312 3419.02,2348.87 3419.02,2353.76 3435.26,2370 3454,2370 3496.46,2412.46 3496.46,2483.36 3596.71,2583.61 3596.71,2614.13 3626.24,2643.66 3654.77,2643.66 3655.76,2642.67 3738.1,2725 3824.63,2725 4348,2725 v1(4803,3180)
NetR138_1: MCIMX6Y2DVM08AB.D17 R138.1 | length 2335.5
  USB 2.0 (90 Diff) DDR3 Data (50-100) w4: MCIMX6Y2DVM08AB.D17@3350.28,2048.28 3350.37,2048.28 3366,2032.64 v1(3366,2032) ; v1(4640,3182) 4688.36,3182 R138.1@4689.36,3181
  Escapes, non-critical tracks, decoupling capacitor vias w4: v1(3366,2032) 3351.48,2032 3306.51,2076.97 3306.51,2220.14 3292.97,2233.69 3251.4,2233.69 3245.78,2239.3 3245.78,2429.22 3568.56,2752 4341.41,2752 4454,2864.59 4454,2867.19 4640,3053.19 v1(4640,3182)
NetR139_1: MCIMX6Y2DVM08AB.C17 R139.1 | length 2266.1
  USB 2.0 (90 Diff) DDR3 Data (50-100) w4: v1(3326,2024) 3328.16,2024 3334.65,2017.51 MCIMX6Y2DVM08AB.C17@3350.28,2017.51 ; v1(4446,3185) 4499.36,3185 R139.1@4503.36,3181
  Escapes, non-critical tracks, decoupling capacitor vias w4: v1(3326,2024) 3313,2037 3313,2058.18 3298.51,2072.67 3298.51,2214.46 3287.29,2225.69 3248.08,2225.69 3233.6,2240.17 3233.6,2433.49 3560.11,2760 4338.09,2760 4445.28,2867.19 4445.28,3184.28 v1(4446,3185)
NetR140_1: MCIMX6Y2DVM08AB.B15 R140.1 | length 2308.7
  USB 2.0 (90 Diff) DDR3 Data (50-100) w4: v1(3404.24,1976.13) 3404.24,1976.56 3413.27,1985.59 MCIMX6Y2DVM08AB.B15@3413.27,1986.02 ; v1(4264,3178) 4315,3178 R140.1@4318,3181
  Escapes, non-critical tracks, decoupling capacitor vias w4: v1(3404.24,1976.13) 3385.14,1976.13 3383.46,1974.45 3300.22,1974.45 3287,1987.67 3193.66,1987.67 3186.72,1994.61 3186.72,2431.72 3345,2590 3345,2616 3515,2786 4160.94,2786 4249,2874.06 4249,3172 4253.47,3176.47 4262.47,3176.47 v1(4264,3178)
NetR141_1: MCIMX6Y2DVM08AB.A16 R141.1 | length 2269.7
  USB 2.0 (90 Diff) DDR3 Data (50-100) w4: MCIMX6Y2DVM08AB.A16@3381.77,1954.52 3381.77,1954.37 3397,1939.15 v1(3397,1939) ; v1(4072,3177) 4123.72,3177 R141.1@4127.72,3181
  Escapes, non-critical tracks, decoupling capacitor vias w4: v1(3397,1939) 3386.3,1928.3 3157.77,1928.3 3144.27,1941.8 3144.27,2058.12 3134.03,2068.36 3134.03,2266.64 3144.39,2277 3157.89,2277 3171.97,2291.07 3171.97,2432.19 3332.24,2592.46 3332.24,2626.42 3500.64,2794.83 3998.91,2794.83 4071.27,2867.19 4071.27,3176.27 v1(4072,3177)
NetR142_1: R142.1 U11.3 | length 118.3
  USB 2.0 (90 Diff) DDR3 Data (50-100) w4: R142.1@880,2944 881.97,2944 899.65,2961.69 899.65,2967.87 940.79,3009 U11.3@967.76,3009
NetR143_2: R143.2 U11.6 | length 79.3
  USB 2.0 (90 Diff) DDR3 Data (50-100) w4: U11.6@1162.24,3009 R143.2@1241.54,3009
NetR147_1: R147.1 R150.2 | length 62.4
  USB 2.0 (90 Diff) DDR3 Data (50-100) w4: R150.2@1312.59,3534 1365,3534 R147.1@1371,3528 ; R147.1@1355.92,3530.08 ccw(c1358.72,3532.93) 1356.25,3529.79 R147.1@1357.25,3529.79
NetR148_1: R148.1 R152.2 U12.3 | length 166.5
  USB 2.0 (90 Diff) DDR3 Data (50-100) w4: R152.2@877,3555.59 876.34,3555.59 866.53,3565.4 R148.1@866.53,3619 876.53,3609 U12.3@960.78,3609
NetR150_1: R150.1 R151.1 U12.5 | length 199.7
  USB 2.0 (90 Diff) DDR3 Data (50-100) w4: R151.1@1146.2,3464 1147.64,3464 1166.55,3482.91 1166.55,3484.34 1183.22,3501.02 U12.5@1183.22,3559 1202.91,3559 1227.91,3534 R150.1@1261.41,3534
NetR156_1: R156.1 U13.1 | length 95.8
  USB 2.0 (90 Diff) DDR3 Data (50-100) w4: U13.1@2457.88,3682.75 2457.88,3662.68 2483.57,3637 R156.1@2519,3637 R156.1@2519,3633.06
NetR157_1: R157.1 R159.2 U13.15 U13.16 U13.17 U13.18 U13.19 | length 360
  USB 2.0 (90 Diff) DDR3 Data (50-100) w4: R157.1@2174.53,3594 2290.4,3594 U13.16@2343.71,3647.31 ; U13.15@2307.7,3682.75 2307.99,3682.75 2343.42,3647.31 U13.16@2343.71,3647.31 ; R159.2@2412.46,3592 2402.77,3601.7 U13.19@2402.77,3646.74 U13.18@2383.08,3646.74 2382.79,3647.03 2363.68,3647.03 U13.17@2363.4,3647.31 U13.16@2343.71,3647.31
NetR159_1: MCIMX6Y2DVM08AB.P8 R159.1 U14.1 | length 2124.8
  USB 2.0 (90 Diff) DDR3 Data (50-100) w4: R159.1@2345.54,3592 2347.5,3592 2361.25,3578.25 2361.25,3576.28 2408.97,3528.57 2408.97,3501.83 U14.1@2420.75,3490.06 2584.26,3490.06 3240.14,2834.17 ccw(c3242.97,2837) 3242.97,2833 3602,2833 v1(3603,2834) ; v1(3617,2348) 3617.39,2348 3633.35,2363.97 MCIMX6Y2DVM08AB.P8@3633.74,2363.97
  Int6 eMMC High-Speed Data Lines (8-bit bus), SDIO/peripherals w4: v1(3603,2834) 3603,2424.48 3642,2385.48 3642,2373 v1(3617,2348)
NetR160_2: R160.2 R164.2 U13.10 | length 194
  USB 2.0 (90 Diff) DDR3 Data (50-100) w4: R164.2@2174.14,3757.59 2174.14,3761.53 2212.79,3800.18 R160.2@2236.61,3800.18 2240.55,3800.18 2251.46,3811.09 U13.10@2343.71,3811.09
NetR161_2: R161.2 R165.2 U13.9 | length 192.8
  USB 2.0 (90 Diff) DDR3 Data (50-100) w4: R161.2@2222.2,3852.59 2222.2,3854.78 2232.01,3864.59 R165.2@2284.61,3864.59 2288,3861.2 2288,3845 2298,3835 2339.32,3835 2367.92,3806.39 2367.92,3799.19
NetR162_2: R162.2 R166.2 U13.8 | length 131.7
  USB 2.0 (90 Diff) DDR3 Data (50-100) w4: R166.2@2367.61,3864.59 R166.2@2369.33,3864.59 ; U13.8@2383.08,3811.09 2383.08,3850.84 R166.2@2369.33,3864.59 ; R162.2@2431.61,3844 2427.67,3844 2407.08,3864.59 R166.2@2369.33,3864.59
NetR163_2: R163.2 R167.2 U13.7 | length 258.3
  USB 2.0 (90 Diff) DDR3 Data (50-100) w4: U13.7@2402.77,3796.92 2402.77,3810.92 2418.04,3826.19 2455.25,3826.19 2494.06,3865 R167.2@2498,3865 2501.94,3865 2515.69,3851.25 2515.69,3847.31 2536.61,3826.39 R163.2@2536.61,3756.65
NetR175_2: MCIMX6Y2DVM08AB.F2 R175.2 | length 2249.5
  USB 2.0 (90 Diff) DDR3 Data (50-100) w4.92: v1(3326,1287) 3327,1287 3383,1231 3383,414.28 3352.53,383.81 3352.53,380.79 3342.02,370.28 R175.2@3339,370.28 ; v1(3807,2096) 3807,2096.14 3822.72,2111.86 MCIMX6Y2DVM08AB.F2@3822.72,2112
  Int6 eMMC High-Speed Data Lines (8-bit bus), SDIO/peripherals w4.92: v1(3326,1287) 3326,1256 3398,1184 3466,1184 3542.54,1260.54 3542.54,1320.92 3596.81,1375.19 3596.81,1415.81 3821.46,1640.46 3821.46,2081.54 v1(3807,2096)
NetR176_2: MCIMX6Y2DVM08AB.F3 R176.2 | length 2212.2
  USB 2.0 (90 Diff) DDR3 Data (50-100) w4: v1(3347,1287) 3349,1287 3392,1244 R176.2@3392,370.28 ; v1(3776,2097) 3776.11,2097 3791.11,2112 MCIMX6Y2DVM08AB.F3@3791.22,2112
  Int6 eMMC High-Speed Data Lines (8-bit bus), SDIO/peripherals w4: v1(3347,1287) 3348.46,1285.54 3348.46,1251.54 3406,1194 3461,1194 3532,1265 3532,1336.97 3574,1378.97 3574,1427 3791,1644 3791,1764.97 3810.37,1784.34 3810.37,1813.66 3791,1833.04 3791,1914.55 3815,1938.55 3815,2041.97 3776,2080.97 v1(3776,2097)
NetR177_2: MCIMX6Y2DVM08AB.F5 R177.2 | length 2287
  USB 2.0 (90 Diff) DDR3 Data (50-100) w4: v1(3368,1287) 3369,1287 3400,1256 3400,487.08 3516.26,370.81 R177.2@3519.28,370.81 ; v1(3712.43,2096.32) 3712.49,2096.32 MCIMX6Y2DVM08AB.F5@3728.23,2112 MCIMX6Y2DVM08AB.F5@3728.23,2112
  Int6 eMMC High-Speed Data Lines (8-bit bus), SDIO/peripherals w4: v1(3368,1287) 3368,1247 3411,1204 3458.69,1204 3524,1269.31 3524,1358 3551,1385 3551,1449 3759.61,1657.61 3759.61,1968.5 3778.01,1986.9 3778.01,2030.72 3756.11,2052.62 3756.11,2112.5 3746.61,2122 3712,2122 3699,2109 3711.68,2096.32 v1(3712.43,2096.32)
NetR178_2: MCIMX6Y2DVM08AB.E5 R178.2 | length 2174.3
  USB 2.0 (90 Diff) DDR3 Data (50-100) w4: v1(3389,1287) 3389.31,1287 3408,1268.31 3408,534.43 3570.26,372.17 R178.2@3573.28,372.17 ; MCIMX6Y2DVM08AB.E5@3728.23,2080.37 MCIMX6Y2DVM08AB.E5@3728.23,2080.5 3728.37,2080.5 3743.86,2096 v1(3744,2096)
  Int6 eMMC High-Speed Data Lines (8-bit bus), SDIO/peripherals w4: v1(3389,1287) 3389,1242 3419,1212 3454,1212 3516,1274 3516,1376 3531,1391 3531,1467 3731,1667 3731,1752.48 3750,1771.48 3750,1800 3731,1819 3731,1908.9 3751,1928.9 3751,1967 3731,1987 3731,2083 v1(3744,2096)
NetR179_2: R179.2 WIFI.15 | length 125.8
  USB 2.0 (90 Diff) DDR3 Data (50-100) w4.6: R179.2@4903.53,427 4916.81,440.28 4997.17,440.28 5009.79,427.67 WIFI.15@5009.79,418.81
NetR180_2: R180.2 WIFI.14 | length 76.8
  USB 2.0 (90 Diff) DDR3 Data (50-100) w4: R180.2@4987,475.72 4990.94,475.72 5028.35,438.3 5028.35,419.93 WIFI.14@5029.47,418.81
NetR181_1: MCIMX6Y2DVM08AB.L15 R181.1 WIFI.32 | length 4609.2
  USB 2.0 (90 Diff) DDR3 Data (50-100) w4: MCIMX6Y2DVM08AB.L15@3413.27,2269.48 3415.29,2267.46 3415.29,2254.08 v1(3415.59,2253.78) ; v1(3482,1289) 3482,1149 3893,738 3893.69,738 3904.02,727.66 5097.34,727.66 5381.87,443.13 5495.87,443.13 5526,413 5615.3,413 5667.24,361.05 5667.24,240.24 5494,67 5301.46,67 5237.94,130.53 R181.1@5234,130.53 5225.91,138.62 5164.38,138.62 5127.9,175.1 WIFI.32@5127.9,231.8
  Int6 eMMC High-Speed Data Lines (8-bit bus), SDIO/peripherals w4: v1(3415.59,2253.78) 3414.94,2253.78 3406.78,2245.62 3403.95,2245.62 3401,2242.67 3401,2208.71 3397,2204.71 3397,2128.27 3340,2071.27 3340,2017.51 3332.65,2010.17 3332.65,1379.38 3435.03,1277 3470,1277 v1(3482,1289)
NetR182_1: R182.1 WIFI.8 | length 109.7
  USB 2.0 (90 Diff) DDR3 Data (50-100) w4: R182.1@5112,476 5115.94,476 5129.69,462.25 5129.69,458.31 5152.5,435.5 WIFI.8@5152.5,394.2 WIFI.8@5161.36,394.2
NetR183_1: R183.1 WIFI.7 | length 119.9
  USB 2.0 (90 Diff) DDR3 Data (50-100) w4.6: WIFI.7@5152.5,374.52 5161.36,374.52 5175,388.16 R183.1@5175,476 R183.1@5171.06,476
NetR184_1: MCIMX6Y2DVM08AB.K15 R184.1 WIFI.13 | length 3566.6
  USB 2.0 (90 Diff) DDR3 Data (50-100) w4: MCIMX6Y2DVM08AB.K15@3413.27,2237.98 3427.79,2223.46 3435.47,2223.46 v1(3437,2221.93) ; v1(3440,1289) 3441,1288 3441,1165 3894.34,711.66 4644.34,711.66 4645,711 5092,711 5263,540 5263,528 5246,511 5089,511 5053,475 R184.1@5049.06,475 5045.13,475 5049.16,470.97 WIFI.13@5049.16,418.81 WIFI.13@5049.31,418.97
  Int6 eMMC High-Speed Data Lines (8-bit bus), SDIO/peripherals w4: 3338.65,1987.66 3338.65,2002.02 3354.89,2018.26 3354.89,2043.75 3443.6,2132.45 3443.6,2206.4 3438.53,2211.47 3438.53,2220.4 v1(3437,2221.93) ; 3338.74,1987.57 3338.65,1987.48 3338.65,1945.48 3348.29,1935.84 3348.29,1380.71 v1(3440,1289)
NetR185_1: R185.1 WIFI.31 | length 143
  USB 2.0 (90 Diff) DDR3 Data (50-100) w4: WIFI.31@5108.21,231.8 5108.21,172.79 5150.28,130.72 5150.28,126.78 5162.06,115 R185.1@5166,115
NetR186_2: R186.2 U16.6 | length 105.7
  USB 2.0 (90 Diff) DDR3 Data (50-100) w4: U16.6@4759.73,288 4779.42,288 4808.42,317 R186.2@4850.36,317 R186.2@4850.36,320.02
NetR200_1: MCIMX6Y2DVM08AB.K13 R200.1 | length 807.4
  USB 2.0 (90 Diff) DDR3 Data (50-100) w4: R200.1@3444,2677 3444,2660.1 3453.1,2651 3496.83,2651 3516.48,2631.35 3516.48,2616.68 3532.86,2600.29 3560.54,2600.29 3584.96,2575.87 3584.96,2393.72 3575.21,2383.96 3528.33,2383.96 3528.11,2384.18 3501.64,2384.18 3498.35,2387.47 3487.56,2387.47 3484.27,2384.18 3472.03,2384.18 3465.11,2377.26 3442.1,2377.26 3429.02,2364.18 3429.02,2363.76 3417.94,2352.68 3386.03,2352.68 3370.05,2336.71 3370.05,2328.24 3378.58,2319.71 3418.98,2319.71 3430.55,2308.14 3430.55,2293.82 3422.75,2286.02 3422.75,2277.73 3423.81,2276.67 3423.81,2274.9 3429.68,2269.03 3429.68,2268.61 3441.42,2256.87 3457.37,2256.87 MCIMX6Y2DVM08AB.K13@3476.26,2237.98
NetU2_D3: DRAM.D3 MCIMX6Y2DVM08AB.T3 | length 598.8
  USB 2.0 (90 Diff) DDR3 Data (50-100) w5.12: MCIMX6Y2DVM08AB.T3@3791.22,2426.96 3808.87,2444.61 3808.87,2464.19 3816.98,2472.3 3821.38,2472.3 3832.09,2483.01 3832.09,2484.29 3842.8,2495 3886,2495 v1(3918,2463) ; DRAM.D3@4234.39,2385.21 4234.8,2385.21 4249.74,2400.16 v1(4250.16,2400.16)
  Int6 eMMC High-Speed Data Lines (8-bit bus), SDIO/peripherals w5.12: v1(3918,2463) 3929.76,2474.76 4224.2,2474.76 4250.16,2448.81 v1(4250.16,2400.16)
NetU2_E7: DRAM.E7 MCIMX6Y2DVM08AB.T7 | length 770.7
  USB 2.0 (90 Diff) DDR3 Data (50-100) w5.12: MCIMX6Y2DVM08AB.T7@3665.24,2426.96 3665.24,2424.74 3673.35,2416.63 v1(3673.35,2414.76) ; v1(4323,2353) 4323.36,2353.36 4357.58,2353.36 4360.37,2350.57 DRAM.E7@4360.37,2353.72
  Int6 eMMC High-Speed Data Lines (8-bit bus), SDIO/peripherals w5.12: v1(3673.35,2414.76) 3752.81,2414.76 3765.43,2402.14 3768.92,2402.14 3770.85,2400.22 3839.66,2400.22 3861,2421.56 4024.88,2421.56 4028.98,2417.45 4189.31,2417.45 4200.56,2406.2 4200.56,2372.68 4221.14,2352.1 4322.1,2352.1 v1(4323,2353)
NetU2_J3: DRAM.J3 MCIMX6Y2DVM08AB.M5 | length 683.4
  USB 2.0 (90 Diff) DDR3 Data (50-100) w5.12: v1(3713,2285) 3713,2285.37 3728.23,2300.6 MCIMX6Y2DVM08AB.M5@3728.23,2300.98 ; DRAM.J3@4234.39,2227.73 4234.39,2227.48 4248.61,2213.26 v1(4248.61,2213)
  Int6 eMMC High-Speed Data Lines (8-bit bus), SDIO/peripherals w5.12: v1(3713,2285) 3728.76,2269.24 3862.48,2269.24 3949.24,2356 4111,2356 4179.14,2287.86 4179.14,2282.46 v1(4248.61,2213)
NetU2_J9: DRAM.J9 MCIMX6Y2DVM08AB.H5 | length 944.8
  USB 2.0 (90 Diff) DDR3 Data (50-100) w5.12: v1(3716.68,2191) 3718,2189.68 3718,2185.92 3728.23,2175.68 MCIMX6Y2DVM08AB.H5@3728.23,2174.99 ; v1(4408,2212) 4408,2212.19 4423.36,2227.55 DRAM.J9@4423.36,2227.73
  Int6 eMMC High-Speed Data Lines (8-bit bus), SDIO/peripherals w5.12: v1(3716.68,2191) 3716.68,2189.14 3724.61,2181.21 3724.61,2178.61 3728.23,2174.99 3856.17,2174.99 3879.73,2198.56 3911.2,2198.56 3928.57,2181.19 3928.57,2160.45 3963.03,2125.99 4110.8,2125.99 4125.92,2110.86 4227.79,2110.86 4273.72,2064.94 4273.72,2062.18 4276.78,2059.12 4352,2059.12 4364.57,2071.69 4364.57,2085.55 4388.56,2109.54 4388.56,2115.32 4394.51,2121.27 4394.51,2198.51 v1(4408,2212)
NetU2_K1: DRAM.K1 MCIMX6Y2DVM08AB.N1 | length 398
  USB 2.0 (90 Diff) DDR3 Data (50-100) w5.12: MCIMX6Y2DVM08AB.N1@3854.21,2332.47 3983.99,2332.47 4078.12,2238.34 4078.12,2202.12 4087.8,2192.44 4118.48,2192.44 4122.28,2196.24 DRAM.K1@4171.39,2196.24
NetU2_K3: DRAM.K3 MCIMX6Y2DVM08AB.J2 | length 642.3
  USB 2.0 (90 Diff) DDR3 Data (50-100) w5.12: MCIMX6Y2DVM08AB.J2@3822.72,2206.49 3820.91,2204.68 3820.91,2192.76 3808.87,2180.73 3808.87,2169.26 3814.69,2163.45 ccw(c3818.28,2167.09) 3819.42,2162.1 3825.12,2163.39 cw(c3826.72,2156.46) 3825.19,2163.41 ccw(c3822.72,2174.99) 3829.22,2165.1 3838.06,2170.91 ccw(c3835.25,2175.19) 3840.37,2175.19 3840.37,2180.73 3852.29,2192.65 3860.75,2192.65 3863.92,2195.82 3888.58,2195.82 3929.76,2237 v1(3955,2237) ; v1(4218,2210) 4219.31,2210 4233.07,2196.24 DRAM.K3@4234.39,2196.24
  Int6 eMMC High-Speed Data Lines (8-bit bus), SDIO/peripherals w5.12: v1(3955,2237) 4078.76,2237 4179.32,2136.44 4225.2,2136.44 4232.56,2143.8 4232.56,2195.44 v1(4218,2210)
NetU2_L1: DRAM.L1 MCIMX6Y2DVM08AB.F1 | length 359.7
  USB 2.0 (90 Diff) DDR3 Data (50-100) w4: MCIMX6Y2DVM08AB.F1@3854.21,2112 3906.95,2164.74 3946.62,2164.74 3971.53,2189.65 4049.66,2189.65 4074.57,2164.74 DRAM.L1@4171.39,2164.74
NetU2_L2: DRAM.L2 MCIMX6Y2DVM08AB.N2 | length 491.5
  USB 2.0 (90 Diff) DDR3 Data (50-100) w5.12: MCIMX6Y2DVM08AB.N2@3822.72,2332.47 3836.56,2346.32 4063.91,2346.32 4165.42,2244.81 4174.72,2244.81 4185.82,2233.71 4185.82,2183.61 4202.89,2166.54 DRAM.L2@4202.89,2164.74
NetU2_L3: DRAM.L3 MCIMX6Y2DVM08AB.J1 | length 559.7
  USB 2.0 (90 Diff) DDR3 Data (50-100) w5.12: MCIMX6Y2DVM08AB.J1@3854.21,2206.49 3856.02,2208.3 3856.02,2216.53 3859,2219.52 v1(3859,2221.38) ; DRAM.L3@4233.82,2164.74 DRAM.L3@4234.39,2164.74 4234.39,2165.06 4248,2178.68 v1(4248,2179)
  Int6 eMMC High-Speed Data Lines (8-bit bus), SDIO/peripherals w5.12: v1(3859,2221.38) 3860.86,2221.38 3867.66,2228.17 3875.17,2228.17 3890.32,2243.32 3890.32,2245.98 3990.34,2346 4099.76,2346 4230.56,2215.2 4230.56,2213.28 4248,2195.84 v1(4248,2179)
NetU2_M2: DRAM.M2 MCIMX6Y2DVM08AB.M1 | length 472.8
  USB 2.0 (90 Diff) DDR3 Data (50-100) w5.12: MCIMX6Y2DVM08AB.M1@3854.21,2300.98 4001.02,2300.98 4068,2234 4068,2204 4069,2203 4069,2198.34 4086.34,2181 4175.53,2181 4188.2,2168.34 4188.2,2147.94 DRAM.M2@4202.89,2133.24 4202.82,2133.24 4187.07,2149 4187,2149
NetU2_M3: DRAM.M3 MCIMX6Y2DVM08AB.K2 | length 606.3
  USB 2.0 (90 Diff) DDR3 Data (50-100) w5.12: MCIMX6Y2DVM08AB.K2@3822.72,2237.98 3823.19,2237.98 3823.19,2237.66 3837.85,2223 v1(3838,2223) ; v1(4220,2149) 4220,2148.32 4234.39,2133.93 DRAM.M3@4234.39,2133.24 DRAM.M3@4233.32,2133.24
  Int6 eMMC High-Speed Data Lines (8-bit bus), SDIO/peripherals w5.12: v1(3838,2223) 3852.18,2208.82 3864.2,2208.82 3872.18,2216.8 3886.95,2216.8 3899.44,2229.28 3899.44,2242.2 3994.12,2336.88 4092.72,2336.88 4155.7,2273.9 4155.7,2254.54 4208.88,2201.36 4208.88,2160.12 v1(4220,2149)
NetU2_N8: DRAM.N8 MCIMX6Y2DVM08AB.H1 | length 937.4
  USB 2.0 (90 Diff) DDR3 Data (50-100) w5.12: MCIMX6Y2DVM08AB.H1@3854.21,2174.99 3855.99,2174.99 3867,2186 v1(3906,2186) ; 4288.53,2236.47 4288.53,2153.19 4354.4,2087.33 4366.34,2087.33 4375.58,2096.56 4383.81,2096.56 4389,2101.75 DRAM.N8@4391.87,2101.75 4392.31,2101.75 4406.56,2116 v1(4407,2116)
  Int6 eMMC High-Speed Data Lines (8-bit bus), SDIO/peripherals w5.12: v1(3906,2186) 3906,2130.34 3945.91,2090.44 4139.07,2090.44 4150,2101.37 4221.63,2101.37 4273,2050 4364.54,2050 4389.69,2075.15 4389.69,2086.45 4405.68,2102.44 4405.68,2114.68 v1(4407,2116)
NetU4_2: MCIMX6Y2DVM08AB.C5 QSPI.2 | length 1006.4
  USB 2.0 (90 Diff) DDR3 Data (50-100) w4: MCIMX6Y2DVM08AB.C5@3728.23,2017.51 3727.66,2016.94 3727.66,2004.23 3714.94,1991.52 3714.94,1920.41 3817,1818.35 3817,1768.48 3889.13,1696.35 3939,1696.35 4121.66,1513.69 4330.99,1513.69 4365,1479.69 4365,1444.34 QSPI.2@4369.68,1439.66
NetU4_5: MCIMX6Y2DVM08AB.A3 QSPI.5 | length 909.9
  USB 2.0 (90 Diff) DDR3 Data (50-100) w4: MCIMX6Y2DVM08AB.A3@3791.22,1954.52 3791.22,1894.41 3857.95,1827.67 3898.31,1827.67 3955,1770.98 3955,1730.63 4029.81,1655.81 4437.5,1655.81 4467,1685.31 4467,1720.84 QSPI.5@4469.68,1723.52
NetU5_2: MCIMX6Y2DVM08AB.F15 U5.2 | length 1905.1
  USB 2.0 (90 Diff) DDR3 Data (50-100) w4: U5.2@2345.32,1403 2345.32,1437.32 2354,1446 2480.12,1446 2596.12,1562 2889.12,1562 3139.12,1812 3150.31,1812 3225,1886.69 3225,2238.49 3298.77,2312.26 3417.94,2312.26 3424.55,2305.65 3424.55,2296.3 3415.01,2286.76 3406.11,2286.76 3395.98,2276.64 3395.98,2230.83 3399,2227.81 3399,2216.66 3395.98,2213.65 3395.98,2129.28 MCIMX6Y2DVM08AB.F15@3413.27,2112
NetU5_3: MCIMX6Y2DVM08AB.E15 U5.3 | length 2042.8
  USB 2.0 (90 Diff) DDR3 Data (50-100) w4: U5.3@2325.63,1403 2325.63,1443.63 2336,1454 2476.8,1454 2592.8,1570 2885.8,1570 3187.07,1871.26 3187.07,2294.03 3194.47,2301.43 3197.78,2301.43 3213.19,2286.02 3245.78,2286.02 3292.76,2333 v1(3322,2333) ; MCIMX6Y2DVM08AB.E15@3413.27,2080.5 3428.24,2065.53
  Int6 eMMC High-Speed Data Lines (8-bit bus), SDIO/peripherals w4: v1(3322,2333) 3367.48,2333 3449.39,2251.09 3449.39,2231.62 3447.86,2230.09 3447.86,2210.63 3449.6,2208.89 3449.6,2078.6 v1(3435,2064)
NetU5_4: MCIMX6Y2DVM08AB.E14 U5.4 | length 2151.7
  USB 2.0 (90 Diff) DDR3 Data (50-100) w4: U5.4@2305.94,1403 2305.94,1449.94 2318,1462 2473.49,1462 2589.49,1578 2882.49,1578 3181.07,1876.58 3181.07,2296.52 3193.64,2309.09 3202.12,2309.09 3211.21,2300 3225,2300 3286,2361 v1(3323,2361) ; MCIMX6Y2DVM08AB.E14@3444.76,2080.5 3444.76,2094.62 3457.76,2107.61 3457.76,2119.66 3459.69,2121.59 3459.69,2127.25 v1(3461.22,2128.78)
  DDR3 Fly-by Routing (Address, Command, Control), QSPI Flash (Clk, IO) w4: v1(3323,2361) 3316.5,2354.5 3316.5,2351.26 3300,2334.76 3300,2160.63 3319.82,2140.81 3365.33,2140.81 3395.08,2111.06 3448.08,2111.06 3453.89,2116.86 3453.89,2119.28 3461.22,2126.62 v1(3461.22,2128.78)
NetU5_31: MCIMX6Y2DVM08AB.L16 U5.31 | length 1882.3
  USB 2.0 (90 Diff) DDR3 Data (50-100) w4: U5.31@2266.57,1070.32 2266.57,1236.57 2389,1359 2427.06,1359 2606.06,1538 2899.06,1538 3149.06,1788 3160.25,1788 3249,1876.75 3249,2153.39 3318.56,2222.95 3354.03,2222.95 3363.56,2232.48 3363.56,2249.56 3381.2,2267.2 3381.2,2268.91 MCIMX6Y2DVM08AB.L16@3381.77,2269.48
NetU5_40: MCIMX6Y2DVM08AB.E16 U5.40 | length 1593.6
  USB 2.0 (90 Diff) DDR3 Data (50-100) w4: U5.40@2423.07,1187.45 2474.76,1187.45 2492,1204.69 2492,1378.69 2619.31,1506 2912.31,1506 3162.31,1756 3173.51,1756 3309.04,1891.53 3374.52,1891.53 3380.5,1897.51 3380.5,1919 3370.49,1929.01 3370.49,1959.19 3386.03,1974.73 3386.45,1974.73 3394.21,1982.5 3394.21,2011.66 ; MCIMX6Y2DVM08AB.E16@3381.77,2080.5 3397.31,2080.5 3410.04,2067.77 3410.46,2067.77 3424.55,2053.68 3424.55,2044.33
  USB 2.0 (90 Diff) DDR3 Data (50-100) w5: 3394.21,2011.66 3394.21,2019.21 3409.49,2034.49 3415.41,2034.49 3424.9,2043.98
NetU5_41: MCIMX6Y2DVM08AB.D15 U5.41 | length 1474.2
  USB 2.0 (90 Diff) DDR3 Data (50-100) w4: U5.41@2423.07,1207.13 2478.13,1207.13 2484,1213 2484,1382 2616,1514 2909,1514 3159,1764 3170.2,1764 3268.81,1862.61 3268.81,1865.44 3271,1867.63 3271,1922.7 3345.6,1997.3 3349.64,1997.3 3364,2011.66 3364,2015.7 3382.89,2034.59 3383.31,2034.59 3397.73,2049.01 MCIMX6Y2DVM08AB.D15@3413.27,2049.01
NetU5_43: MCIMX6Y2DVM08AB.F16 U5.43 | length 1514.4
  USB 2.0 (90 Diff) DDR3 Data (50-100) w4: U5.43@2423.07,1246.5 2467.5,1246.5 2476,1255 2476,1385.31 2612.69,1522 2905.69,1522 3155.69,1772 3166.88,1772 3265,1870.12 3265,2057.64 3267.34,2059.98 3307.94,2059.98 3314.82,2066.86 3355.42,2066.86 3367.76,2079.21 3367.76,2097.99 MCIMX6Y2DVM08AB.F16@3381.77,2112
NetU5_44: MCIMX6Y2DVM08AB.E17 U5.44 | length 1440.3
  USB 2.0 (90 Diff) DDR3 Data (50-100) w4: U5.44@2423.07,1266.19 2458.19,1266.19 2468,1276 2468,1388.63 2609.37,1530 2902.37,1530 3152.37,1780 3163.57,1780 3257,1873.43 3257,2060.95 3264.03,2067.98 3273.73,2067.98 3286.25,2080.5 MCIMX6Y2DVM08AB.E17@3350.28,2080.5